# Altium PCB PCB_LV.PcbDoc
Units mm, origin at the board's own origin, x right, y up, seen from the top; angles counter-clockwise.
Board outline 41.98 x 19.29 mm, 4 copper layers (Top Layer, Layer 1, Layer 2, Bottom Layer), stack 0.603 mm thick; 21 components, 18 nets, 94 pads, 13 vias.
Unrouted connection lines stored in the file: 6.
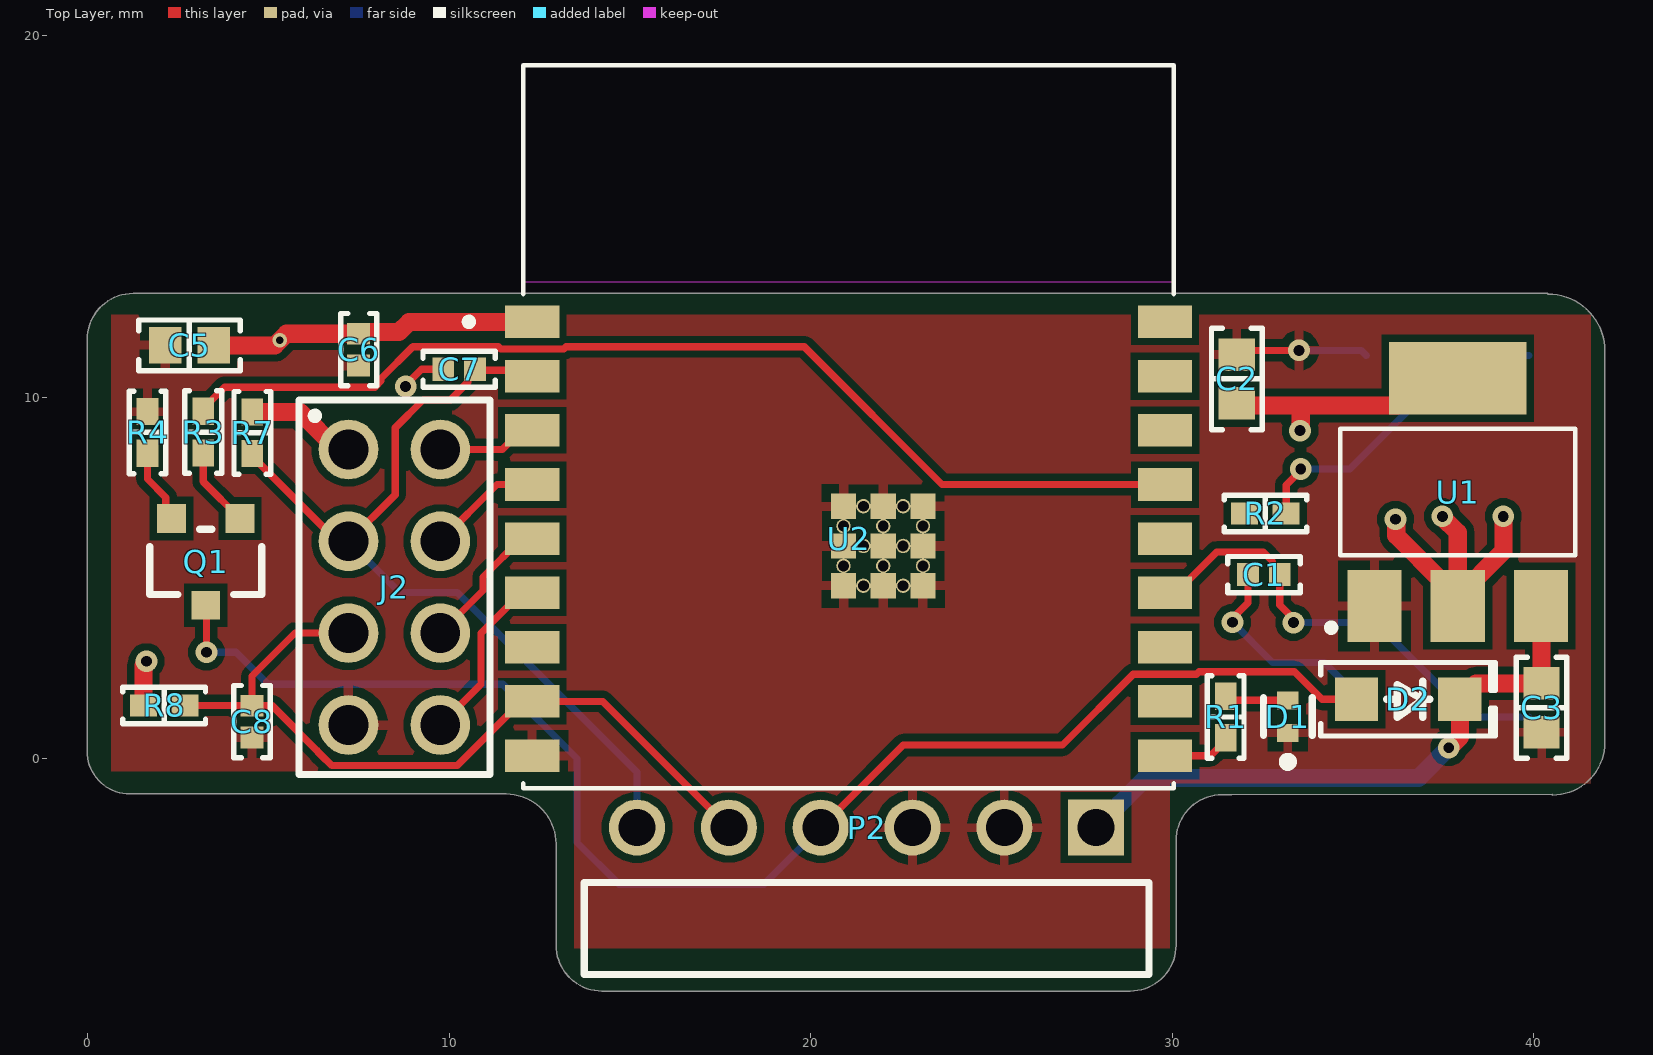
[diagram p0: Top Layer view]
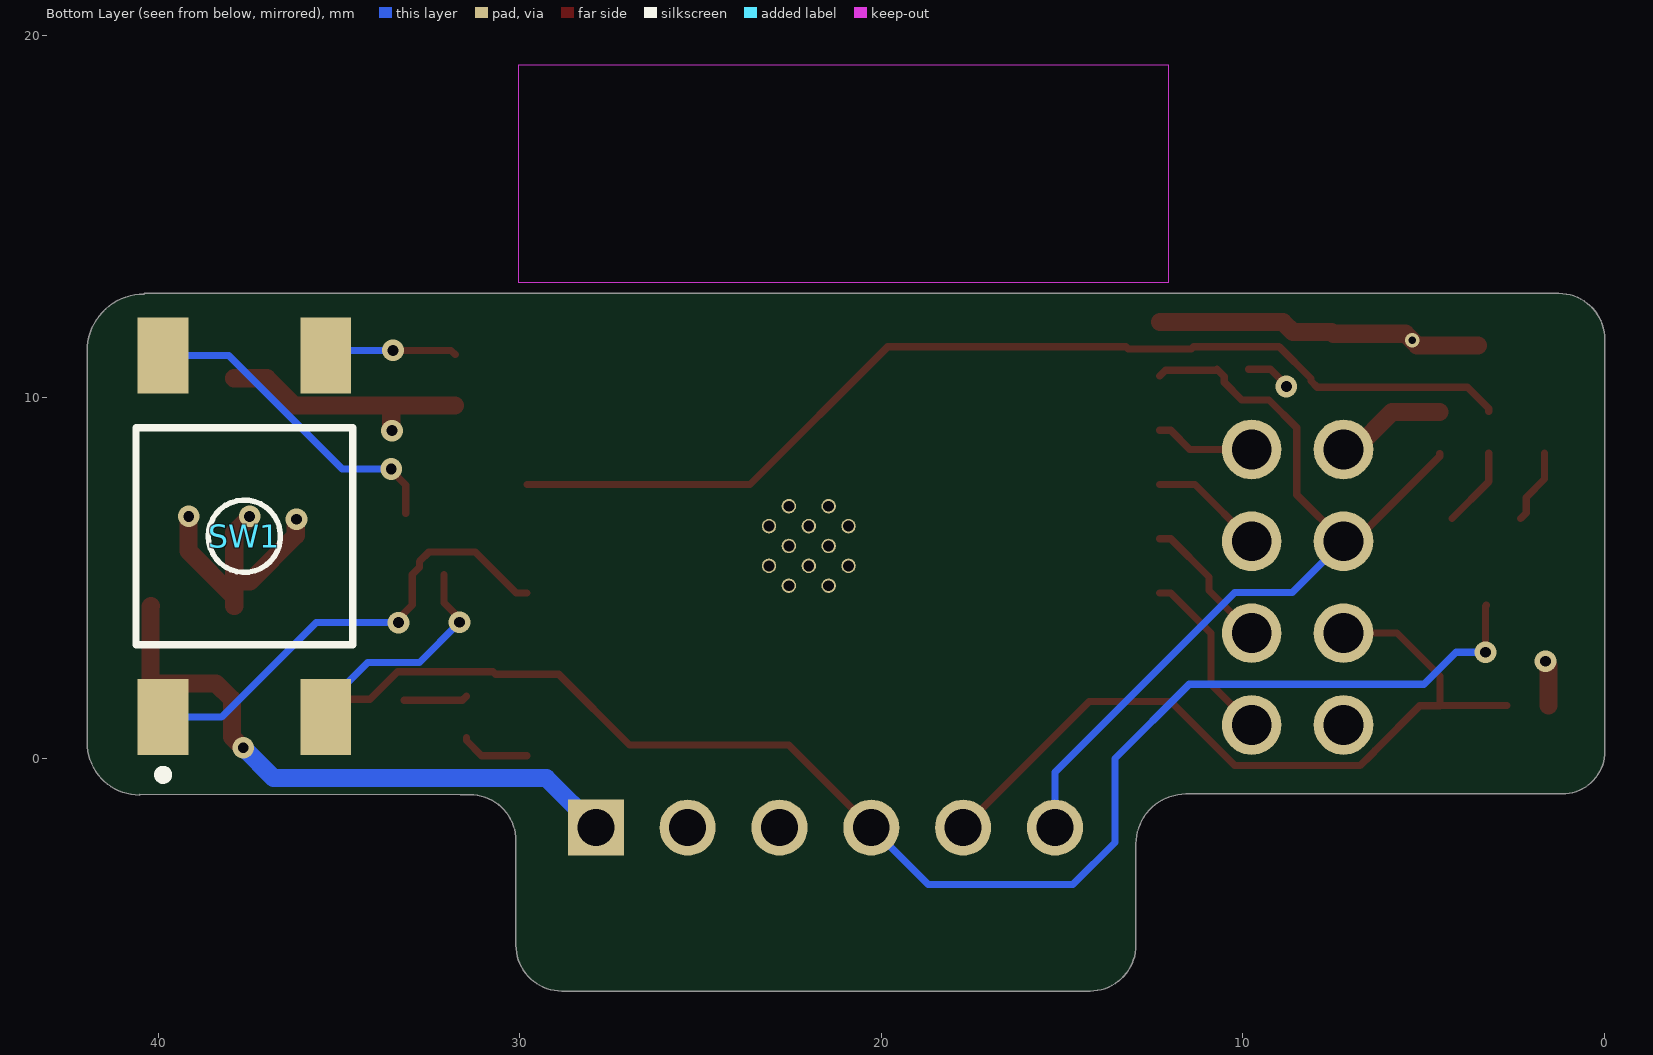
[diagram p1: Bottom Layer view, seen from below]
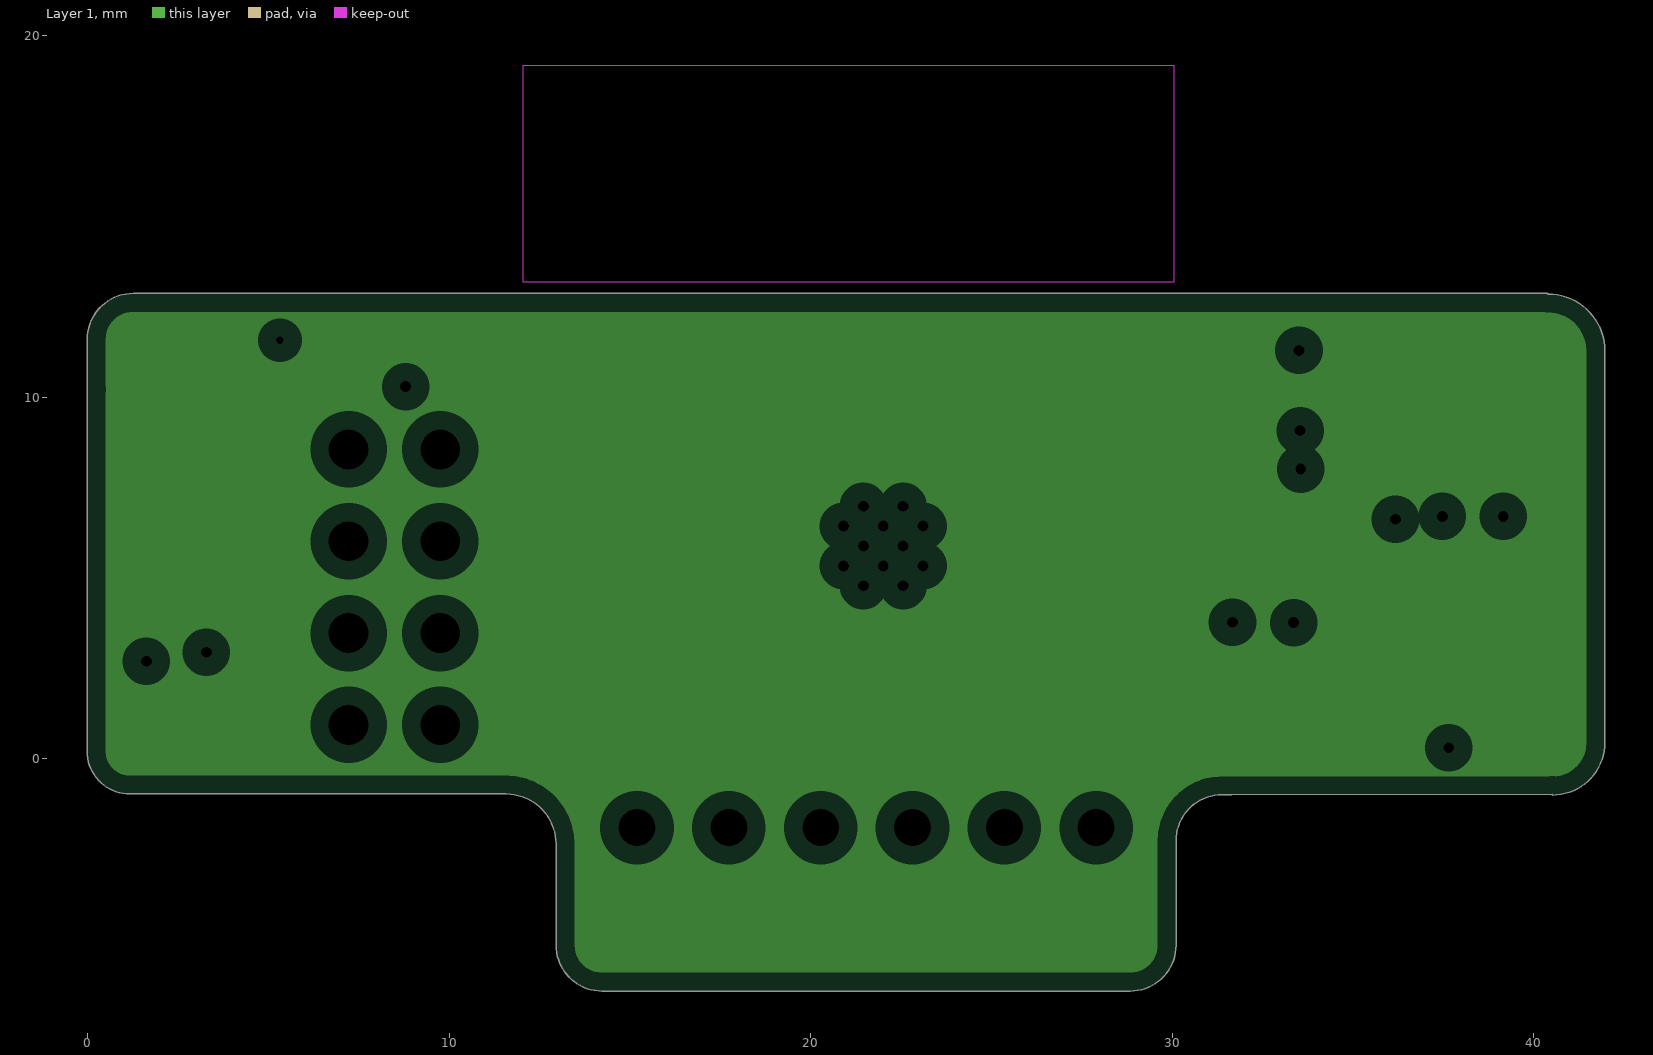
[diagram p2: Layer 1, clearances drawn from the general rule]
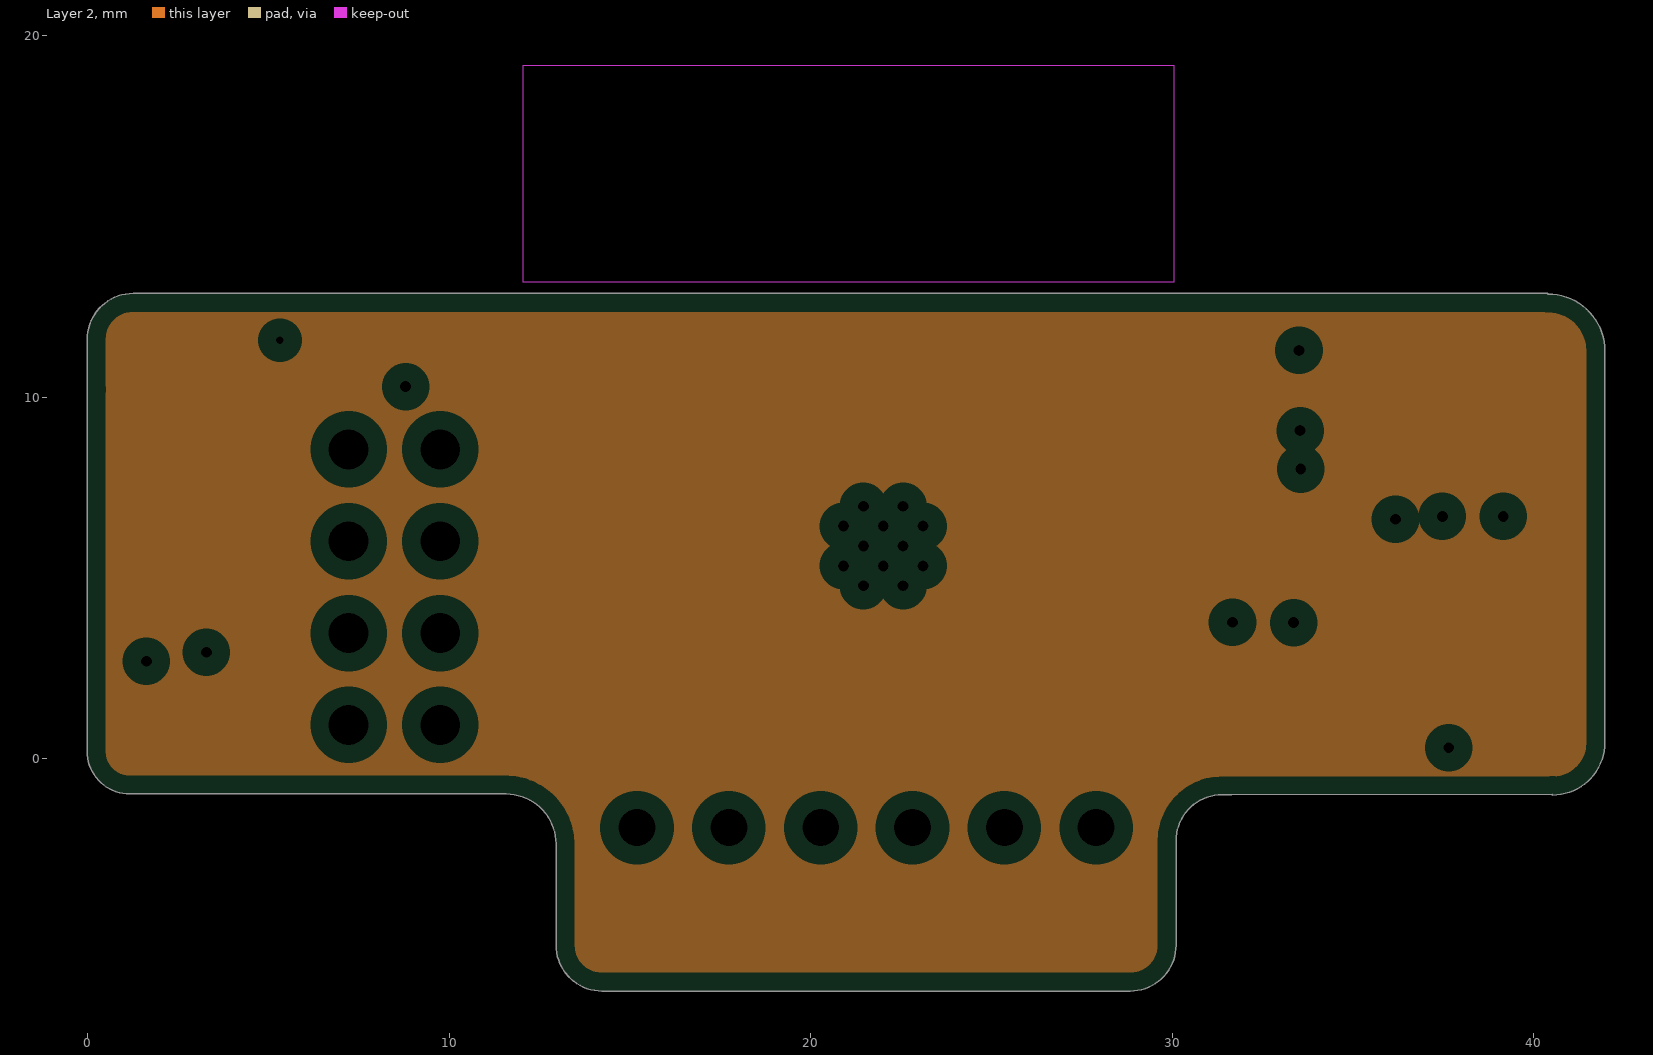
[diagram p3: Layer 2, clearances drawn from the general rule]

## Layer stack, top to bottom
Top Solder: solder mask 0.0102, Solder Resist, Dk 3.5
Top Layer: signal copper 0.0356
Dielectric 2: prepreg 0.0711, PP-006, Dk 4.1
Layer 1: plane copper 0.035, net GND
Dielectric 1: dielectric 0.32, FR-4, Dk 4.8
Layer 2: plane copper 0.035, net 3V3
Dielectric 3: prepreg 0.0711, PP-006, Dk 4.1
Bottom Layer: signal copper 0.0356
Bottom Solder: solder mask 0.0102, Solder Resist, Dk 3.5

## Board outline
1.172,-0.97 cw(c1.172,0.212) -0.01,0.212 -0.01,10.21 ccw(c-0.01,10.22) 0,10.22 -0.01,10.22 -0.01,11.604 cw(c1.26,11.604) 1.26,12.874 40.392,12.874 40.392,12.859 cw(c40.392,11.281) 41.97,11.281 41.97,0.451 cw(c40.519,0.451) 40.519,-1 40.519,-0.975 31.649,-0.989 31.38,-0.989 ccw(c31.38,-2.259) 30.11,-2.259 30.11,-5.15 cw(c28.84,-5.15) 28.84,-6.42 14.23,-6.42 cw(c14.23,-5.15) 12.96,-5.15 12.96,-2.352 ccw(c11.578,-2.352) 11.578,-0.97

## Design rules (kind name [scope] priority, off if disabled: settings)
Clearance HV_LV_Clearance [InNetClass('High Power') vs InNetClass('Low Power')] p1: gap=0.254 ignorepadtopadclearanceinfootprint=FALSE
Clearance [All] p2: gap=0.2 ignorepadtopadclearanceinfootprint=FALSE
MinimumSolderMaskSliver [All] p1: minsoldermaskwidth=0.1
PlaneClearance [All] p1: clearance=0.508
PlaneConnect [All] p1: planeconnectstyle=Direct reliefexpansion=0.508 reliefentries=4 reliefconductorwidth=0.254 reliefairgap=0.254
PolygonConnect [All] p1: connectstyle=Relief reliefconductorwidth=0.254 reliefentries=4 polygonreliefangle="90 Angle" airgapwidth=0.254
RoutingVias Via_LV [All] p1: holewidth=0.3 width=0.6 viastyle="Through Hole" minholewidth=0.2 minwidth=0.4 maxholewidth=0.3 maxwidth=0.6
SilkToSolderMaskClearance [IsText] p1: minsilkscreentomaskgap=0.004 clearancetoexposedcopper=TRUE
SolderMaskExpansion [All] p1: expansion=0 istentingtop=FALSE
SupplyNets "Schematic Supply Nets_2" [InNet('3V3')] p1: voltage=0.000
SupplyNets "Schematic Supply Nets_1" [InNet('GND')] p2: voltage=0.000
SupplyNets "Schematic Supply Nets" [InNet('5V')] p3: voltage=0.000
Width Width_LV [InNetClass('LV')] p1: maxlimit=0.5 minlimit=0.5 preferedwidth=0.5
Width [All] p2: maxlimit=0.2 minlimit=0.1 preferedwidth=0.15
26 further rules are at their usual default settings.

## Classes and differential pairs
net class LV: 3V3 5V

## Components (designator, comment, footprint, x,y, rotation, side; value= is the part's Value field where it differs from the comment)
C1 "=VALUE" "CAP 0402_1005" 32.54,5.1 r0 top
C2 "10 µF" "CAP 0603_1608" 31.79,10.51 r270 top
C3 "10 µF" "CAP 0603_1608" 40.22,1.415 r90 top
C5 "=VALUE" "CAP 0603_1608" 2.82,11.44 r180 top
C6 "=VALUE" "CAP 0402_1005" 7.5,11.32 r90 top
C7 "=VALUE" "CAP 0402_1005" 10.28,10.78 r0 top
C8 "=VALUE" "CAP 0402_1005" 4.55,1.03 r90 top
D1 "SML-P11DTT86R" FP-SML-P11-MFG 33.2,1.17 r90 top
D2 "1N4007FLTR" SOD123F 36.53,1.65 r0 top
J2 "6130XX21121_61300821121" 61300821121 8.49,4.75 r270 top
P2 "TSW-106-08-F-S-RA" SMTC-TSW-106-08-X-S-RA 27.9,-1.9 r180 top
Q1 "AO3400A" FP-SOT23-MFG 3.27,5.45 r270 top
R1 "1 kOhms" "RES 0402_1005" 31.48,1.16 r270 top
R2 "10 kOhms" "RES 0402_1005" 32.58,6.79 r180 top
R3 "100 Ohms" "RES 0402_1005" 3.2,9.04 r270 top
R4 "100 kOhms" "RES 0402_1005" 1.66,9.03 r270 top
R7 "10 kOhms" "RES 0402_1005" 4.56,9.02 r90 top
R8 "10 kOhms" "RES 0402_1005" 2.12,1.48 r180 top
SW1 "1301.9320" FP-1301_9320-MFG 37.62,6.16 r90 bottom
U1 "NCP1117LPST33T3G" SOT230P700X175-4N 37.9,7.38 r90 top
U2 "ESP32-C3-WROOM-02-N4" *MODULE_ESP32-C3-WROOM-02-H4 21.05,9.19 r0 top

## Footprints (in the part's own frame and the unit in brackets; to place one, negate y for a bottom-side part, rotate by r counter-clockwise, add the part's x,y. Pads: shape width x height; smd on the part's side, far side on the other; paste and mask are expansions set on the pad)
61300821121 [mm]
  round 1.65 hole 1.1: 1(-3.81,-1.27) 2(-3.81,1.27) 3(-1.27,-1.27) 4(-1.27,1.27) 5(1.27,-1.27) 6(1.27,1.27) 7(3.81,-1.27) 8(3.81,1.27)
  silkscreen extent -5.18,-2.64 5.18,2.64, body extent -4.95,-2.54 5.21,2.54, height 8.54
*MODULE_ESP32-C3-WROOM-02-H4 [mm]
  rect 1.5x0.9 smd: 1(-8.75,2.9) 2(-8.75,1.4) 3(-8.75,-0.1) 4(-8.75,-1.6) 5(-8.75,-3.1) 6(-8.75,-4.6) 7(-8.75,-6.1) 8(-8.75,-7.6) 9(-8.75,-9.1) 10(8.75,-9.1) 11(8.75,-7.6) 12(8.75,-6.1) 13(8.75,-4.6) 14(8.75,-3.1) 15(8.75,-1.6) 16(8.75,-0.1) 17(8.75,1.4) 18(8.75,2.9)
  rect 0.7x0.7 smd: 19(-0.14,-2.2) 20(0.96,-2.2) 21(2.06,-2.2) 22(-0.14,-3.3) 23(0.96,-3.3) 24(2.06,-3.3) 25(-0.14,-4.4) 26(0.96,-4.4) 27(2.06,-4.4)
  round 0.4 hole 0.3: 28(0.41,-2.2) 29(1.51,-2.2) 30(-0.14,-2.75) 31(0.96,-2.75) 32(2.06,-2.75) 33(0.41,-3.3) 34(1.51,-3.3) 35(-0.14,-3.85) 36(0.96,-3.85) 37(2.06,-3.85) 38(0.41,-4.4) 39(1.51,-4.4)
  Keep-Out Layer region: -9,10 9,10 9,4 -9,4
  Keep-Out Layer region: -9,10 9,10 9,4 -9,4
  Keep-Out Layer region: -9,10 9,10 9,4 -9,4
  Keep-Out Layer region: -9,10 9,10 9,4 -9,4
  Keep-Out Layer region: -9,10 9,10 9,4 -9,4
  Keep-Out Layer region: -9,10 9,10 9,4 -9,4
  Keep-Out Layer region: -9,10 9,10 9,4 -9,4
  Keep-Out Layer region: -9,10 9,10 9,4 -9,4
  Keep-Out Layer region: -9,10 9,10 9,4 -9,4
  silkscreen extent -10.6,-10 9,10, body extent -9.13,-10 8.87,10, height 3.35
"CAP 0402_1005" [mm] "Chip Capacitor, 2-Leads, Body 1.02x0.51mm, IPC Medium Density"
  rect 0.6x0.64 smd: 1(-0.44,0) 2(0.44,0)
  silkscreen extent -1,-0.5 1,0.5, body extent -0.5,-0.26 0.5,0.26, height 0.52
"CAP 0603_1608" [mm] "Chip Capacitor, 2-Leads, Body 1.60x0.80mm, IPC Medium Density"
  rect 0.9x1 smd: 1(-0.675,0) 2(0.675,0)
  silkscreen extent -1.4,-0.7 1.4,0.7, body extent -0.8,-0.41 0.8,0.41, height 0.82
FP-1301_9320-MFG [mm]
  rect 2.1x1.4 smd paste+0 mask+0: 1(-5,2.25) 2(5,2.25) 3(-5,-2.25) 4(5,-2.25)
  silkscreen extent -6.72,-3 3,3, body extent -5,-3 5,3, height 12.5
FP-SML-P11-MFG [mm]
  rect 0.5x0.6 smd paste+0 mask+0: 1(-0.45,0) 2(0.45,0)
  silkscreen extent -1.37,-0.67 0.53,0.67, body extent -0.8,-0.43 0.8,0.43, height 0.25
FP-SOT23-MFG [mm]
  rect 0.8x0.8 smd paste+0 mask+0: 1(-1.2,0.95) 2(-1.2,-0.95) 3(1.2,0)
  silkscreen extent -0.9,-1.55 0.9,1.55, body extent -1.7,-1.78 1.7,1.78, height 0.25
"RES 0402_1005" [mm] "Chip Resistor, 2-Leads, Body 1.0x0.5mm, IPC Medium Density"
  rect 0.75x0.6 smd: 1(-0.575,0) 2(0.575,0)
  silkscreen extent -1.14,-0.51 1.14,0.51, body extent -0.5,-0.25 0.5,0.25, height 0.35
SMTC-TSW-106-08-X-S-RA [mm] ".025 SQ Post Terminal Strip Assembly, 1x6 Pins, Right Angle, 2.54mm Pitch, Male"
  rect 1.55x1.55 hole 1.02: 1(0,0)
  round 1.55 hole 1.02: 2(2.54,0) 3(5.08,0) 4(7.62,0) 5(10.16,0) 6(12.7,0)
  silkscreen extent -1.46,1.52 14.16,4.06, body extent -1.27,-0.32 13.97,9.9, height 3.05
SOD123F [mm] "SODFL, 2-Leads, Body 1.60x3.50mm, IPC Medium Density"
  rect 1.2x1.2 smd: 1(-1.43,0) 2(1.43,0)
  silkscreen extent -2.41,-1.02 2.41,1.02, body extent -1.75,-0.8 1.75,0.8, height 1.1
SOT230P700X175-4N [mm]
  rect 2x1.5 smd paste+0 mask+0.102: 1(-3.15,2.3) 2(-3.15,0) 3(-3.15,-2.3)
  rect 2x3.8 smd paste+0 mask+0.102: 4(3.15,0)
  silkscreen extent -3.85,-3.25 1.75,3.6, body extent -3.5,-3.45 3.5,3.05, height 1.57

## Part data
C1 C6 C7 C8: library part CC0402MRX5R5BB104, "CAP CER 0.1UF 6.3V X5R 0402", Capacitance="0.1 µF", Part Number=CC0402MRX5R5BB104
C2 C3: library part GMC10X7R106M6R3NT, "CAP0603 X7R 10UF 20% 6.3V", Device Package="0603 (1608 Metric)", Manufacturer="Cal-Chip Electronics, Inc.", Operating Temperature="-55°C ~ 125°C", Supplier Part Number 1=4713-GMC10X7R106M6R3NTCT-ND, Temperature Coefficient=X7R, Tolerance=±20%, Voltage - Rated=6.3V, Applications="General Purpose", Capacitance="10 µF", ComponentLink1Description=Datasheet, ComponentLink1URL=https://88ce57.p3cdn1.secureserver.net/wp-content/uploads/2023/01/gmc_series-2.pdf, ComponentLink2Description="DigiKey Link", ComponentLink2URL=https://www.digikey.com/en/products/detail/cal-chip-electronics-inc/GMC10X7R106M6R3NT/18151153, lastupdated="06/04/2026 7:21:43 PM", Lifecycle Status=Active, Minimum Order=1, Mounting Type="Surface Mount, MLCC", Package / Case="0603 (1608 Metric)", Packaging=TapeAndReel, Part Number=GMC10X7R106M6R3NT, Part Status=Active, partid=49831, Price=0.09, Series=GMC, Size / Dimension="0.063\" L x 0.031\" W (1.60mm x 0.80mm)", Supplier 1=DigiKey, Thickness (Max)="0.039\" (1.00mm)"
C5: library part GRT188R61A106KE13D, "CAP CER 10UF 10V X5R 0603", Capacitance="10 µF", Part Number=GRT188R61A106KE13D
D1: library part CMP-08952-000022-1, "LED ORANGE CLEAR 1006 SMD", Colour=Orange, Forward Current=1mA, Forward Voltage=1.9V, Manufacturer=Rohm, Package=SML-P11, Power Dissipation=52mW, Reverse Voltage=5V, Temperature="-40°C to +85°C", Temperature Range High=+85°C, Temperature Range Low=-40°C, Automotive=No, Category=Diode, ComponentLink2Description=Datasheet, ComponentLink2URL=https://d1d2qsbl8m0m72.cloudfront.net/en/products/databook/datasheet/opto/led/chip_mono/sml-p11-e.pdf, Device Class L1=Optoelectronics, Device Class L2=LEDs, Device Class L3=unset, Digikey Description="LED ORANGE CLEAR 1006 SMD", Height=0.25mm, Lead Free=Yes, Led Orientation="Top View", Luminous Intensity=7.3mcd, Manufacturer Part Number=SML-P11DTT86R, Mouser Description="LED Uni-Color Orange 2-Pin Chip 0402(1006Metric) T/R", Octopart=https://octopart.com/sml-p11dtt86r-rohm-34112313, RoHS=TRUE, Wavelength=605nm
D2: "STANDARD RECTIFIER 1000V SOD-123", Part Number=1N4007FLTR
J2: "Connector Header Through Hole 8 position 0.100 (2.54mm)", Package=None, Check_prices=https://www.snapeda.com/parts/61300821121/Wurth+Electronics/view-part/?ref=eda, MF="Wurth Electronics", MP=61300821121, SnapEDA_Link=https://www.snapeda.com/parts/61300821121/Wurth+Electronics/view-part/?ref=snap
P2: library part CMP-1024-00389-1, "0.025\" SQ Post Header, Through-hole, Right Angle, -55 to 125 degC, 2.54 mm Pitch, 6-Pin, Male, RoHS", Manufacturer=Samtec, Temperature Range="-55 to 125 degC", ComponentLink1Description="Manufacturer URL", ComponentLink1URL=http://www.samtec.com, ComponentLink2Description=Datasheet, ComponentLink2URL=http://www.samtec.com/documents/webfiles/pdf/TSW_TH.PDF, ComponentLink3Description="Package Specification", ComponentLink3URL=http://www.samtec.com/documents/webfiles/cpdf/TSW-XXX-XX-XXX-X-XX-XXX-MKT.pdf, DatasheetVersion=F-214, Mounting Technology=Through-hole, Orientation="Right Angle", PackageDescription=".025[0.64] SQ. Post Terminal Strip Assembly", PackageReference=TSW-106-08-X-S-RA, PackageVersion="DM, 8/1988", PartNumber=TSW-106-08-F-S-RA, Pitch="2.54 mm", RoHS=True, System=Connector
Q1: library part CMP-83955-000006-1, "MOSFET N-CH 30V 5.7A SOT23", Case/Package=SOT-23, Continuous Drain Current (ID)=5.7A, Drain to Source Voltage (Vdss)=30V, Gate to Source Voltage (Vgs)=12V, Input Capacitance=630pF, Max Operating Temperature=150°C, Max Power Dissipation=1.4W, Min Operating Temperature=-55°C, Lead Free="Lead Free", Mount="Surface Mount", Number of Elements=1, Number of Pins=3, Packaging="Tape and Reel", Power Dissipation=1.4W, Radiation Hardening=No, Rds On Max=26.5mR
R1: library part TNPU04021K00BZEP00, "TNPU0402 1K0 0.1% T-16 EP1 E3", Device Package="0402 (1005 Metric)", Manufacturer="Vishay Dale", Operating Temperature="-55°C ~ 125°C", Power (Watts)="0.063W, 1/16W", Ratings=AEC-Q200, Supplier Device Package=0402, Supplier Part Number 1=541-TNPU04021K00BZEP00CT-ND, Temperature Coefficient=±5ppm/°C, Tolerance=±0.1%, ComponentLink1Description=Datasheet, ComponentLink1URL=http://www.vishay.com/docs/28779/tnpue3.pdf, ComponentLink2Description="DigiKey Link", ComponentLink2URL=https://www.digikey.com/en/products/detail/vishay-dale/TNPU04021K00BZEP00/10668523, Composition="Thin Film", Features="Anti-Sulfur, Automotive AEC-Q200, Moisture Resistant", Height - Seated (Max)="0.016\" (0.40mm)", lastupdated="09/02/2024 8:29:39 PM", Lifecycle Status=Active, Minimum Order=1, Number of Terminations=2, Package / Case="0402 (1005 Metric)", Packaging=TapeAndReel, Part Number=TNPU04021K00BZEP00, Part Status=Active, partid=49940, Price=0.67, Resistance="1 kOhms", Series="TNPU e3", Size / Dimension="0.039\" L x 0.020\" W (1.00mm x 0.50mm)", Supplier 1=DigiKey
R2 R7 R8: library part TNPU040210K0BZEP00, "TNPU0402 10K 0.1% T-16 EP1 E3", Part Number=TNPU040210K0BZEP00
R3: library part TNPU0402100RBZEP00, "TNPU0402 100R 0.1% T-16 EP1 E3", Part Number=TNPU0402100RBZEP00
R4: library part TNPU0402100KBZEP00, "TNPU0402 100K 0.1% T-16 EP1 E3", Part Number=TNPU0402100KBZEP00
SW1: library part CMP-26321-000001-1, "SWITCH TACTILE SPST-NO 0.05A 12V", Contact Current Rating=50mA, Contact Resistance=100mΩ, Manufacturer=Schurter, Operating Force=1.6N, Package=0, Temperature="-20°C to +70°C", Temperature Range High=+70°C, Temperature Range Low=-20°C, Voltage Rating Dc=12V, Automotive=No, Category=Switch, ComponentLink2Description=Datasheet, ComponentLink2URL=https://www.schurter.com/en/datasheet/typ_6x6_mm_tact_switches.pdf, Device Class L1=Electromechanical, Device Class L2=Switches, Device Class L3="Tactile Switches", Digikey Description="SWITCH TACTILE SPST-NO 0.05A 12V", Electromechanical Life=100000Cycles, Height=12.5mm, Lead Free=Yes, Manufacturer Part Number=1301.9320, Mount="Surface Mount", Octopart=https://octopart.com/1301.9320-schurter-6627962, RoHS=TRUE, Throw Configuration=SPST-NO
U1: "Linear Voltage Regulator IC Positive Fixed 1 Output 1A SOT-223", Package="SOT-223-4 ON Semiconductor", Check_prices=https://www.snapeda.com/parts/NCP1117LPST33T3G/Onsemi/view-part/?ref=eda, MF="ON Semiconductor", MP=NCP1117LPST33T3G, SnapEDA_Link=https://www.snapeda.com/parts/NCP1117LPST33T3G/Onsemi/view-part/?ref=snap
U2: "WiFi Modules (802.11) (Engineering Samples) SMD module, ESP32-C3, 4MB SPI flash, PCB antenna, -40 C +85 C", Package=Package, Availability="In Stock", Check_prices=https://www.snapeda.com/parts/ESP32-C3-WROOM-02-N4/Espressif+Systems/view-part/?ref=eda, MF="Espressif Systems", MP=ESP32-C3-WROOM-02-N4, Price=None, Purchase-URL="https://www.snapeda.com/api/url_track_click_mouser/?unipart_id=5683419&manufacturer=Espressif Systems&part_name=ESP32-C3-WROOM-02-N4&search_term=esp32-c3-wroom-02", SnapEDA_Link=https://www.snapeda.com/parts/ESP32-C3-WROOM-02-N4/Espressif+Systems/view-part/?ref=snap

## Via types
v1: diameter 0.6, hole 0.3, Top Layer to Bottom Layer, 12 vias
v2: diameter 0.4, hole 0.2, Top Layer to Bottom Layer, 1 vias

## Nets (pads, with @x,y where several pads share a name; then routed paths per layer and width w, separated by ;. In a path a pad name is that pad's centre, name@x,y a point inside that pad or via, vN(x,y) a via of type N, cw(c..) or ccw(c..) an arc to the next point about the centre after c; other vN are vias at no path point)
3V3: C2.2 C5.1 C6.2 J2.1 R2.2 R7.2 R8.2 U1.2 U1.4 U2.1 | length 28.9
  Top Layer w0.5: R8.2 1.545,2.588 1.63,2.673 v1(1.63,2.7) ; C5.1 5.18,11.44 5.5,11.76 C6.2 7.55,11.81 8.62,11.81 8.9,12.09 U2.1 ; R7.2 5.874,9.595 6.909,8.56 J2.1 ; C2.2@31.79,9.775 33.63,9.775 ; v1(33.54,9.08) 33.559,9.099 33.559,9.704 33.63,9.775 ; v1(36.18,6.63) 36.199,6.611 36.199,6.181 37.47,4.91 U1.2@37.9,4.91 ; v1(37.476,6.709) 37.476,6.681 37.9,6.258 U1.2@37.9,4.91 ; U1.4 37,10.53 36.245,9.775 33.63,9.775 ; v1(39.16,6.71) 39.17,6.7 39.17,5.75 37.9,4.48 U1.2 U1.2@37.9,4.91
  other v2: 5.32,11.58
5V: C3.2 D2.2 P2.1 U1.3 | length 16.7
  Top Layer w0.5: v1(37.65,0.31) 37.667,0.31 37.96,0.603 D2.2 38.4,2.09 C3.2 40.22,4.21 U1.3
  Bottom Layer w0.5: P2.1 29.27,-0.53 36.81,-0.53 v1(37.65,0.31)
BOOT: C8.2 J2.5 P2.5 R8.1 U2.8 | length 21.9
  Top Layer w0.2: R8.1 4.54,1.48 C8.2 ; J2.5 5.737,3.48 4.55,2.293 C8.2 ; 10.938,0.527 10.226,-0.185 6.848,-0.185 6.765,-0.185 6.438,0.131 cw(c7.22,0.94) 6.337,0.243 5.11,1.47 C8.2 ; 10.938,0.528 12,1.59 U2.8 14.25,1.59 P2.5
BP1: C1.2 SW1.1 U2.13 | length 13.1
  Top Layer w0.2: U2.13 30.1,4.59 31.23,5.72 32.524,5.72 32.78,5.464 32.78,5.3 C1.2 32.98,4.258 33.36,3.878 v1(33.36,3.77)
  Bottom Layer w0.2: v1(33.36,3.77) 35.64,3.77 38.25,1.16 SW1.1
CMD: R3.1 U2.15 | length 29
  Top Layer w0.2: R3.1 3.2,9.69 3.79,10.28 7.944,10.28 8.12,10.456 8.12,10.52 9,11.4 11.366,11.4 11.426,11.34 13.174,11.34 13.234,11.4 19.824,11.4 23.634,7.59 U2.15
EN: C7.2 J2.3 P2.6 R7.1 U2.2 | length 24.2
  Top Layer w0.2: R7.1 4.56,8.37 6.91,6.02 J2.3 8.51,7.31 8.51,9.161 9.279,9.93 10.034,9.93 10.52,10.416 10.52,10.58 C7.2 10.75,10.75 12.14,10.75 U2.2
  Bottom Layer w0.2: J2.3 8.635,4.605 10.226,4.605 15.2,-0.369 P2.6
GND: C2.1 C3.1 C5.2 C6.1 C7.1 C8.1 D1.1 J2.7 P2.2 P2.3 R4.1 SW1.4 U1.1 U2.9 U2.19 U2.20 U2.21 U2.22 U2.23 U2.24 U2.25 U2.26 U2.27 U2.28 U2.29 U2.30 U2.31 U2.32 U2.33 U2.34 U2.35 U2.36 U2.37 U2.38 U2.39 | length 4.9
  Top Layer w0.2: v1(8.8,10.3) 8.8,10.34 9.24,10.78 C7.1 ; C2.1 31.905,11.3 v1(33.51,11.3)
  Bottom Layer w0.2: v1(33.51,11.3) 35.23,11.3 SW1.4
LED: R1.2 U2.10 | length 1.9
  Top Layer w0.2: U2.10 31.06,0.09 31.48,0.51 R1.2
NetC1_1: C1.1 SW1.3 | length 6.5
  Top Layer w0.2: v1(31.67,3.78) 31.67,3.888 32.1,4.318 C1.1
  Bottom Layer w0.2: v1(31.67,3.78) 32.78,2.67 34.21,2.67 35.37,1.51 SW1.3
NetD1_2: D1.2 R1.1 | length 1.8
  Top Layer w0.2: R1.1 31.595,1.62 D1.2
NetQ1_1: Q1.1 R3.2 | length 2.2
  Top Layer w0.2: R3.2 3.2,7.67 Q1.1
NetQ1_2: Q1.2 R4.2 | length 2.1
  Top Layer w0.2: R4.2 1.66,7.74 2.167,7.233 2.167,6.803 Q1.2
NetR2_1: R2.1 SW1.2 | length 9
  Top Layer w0.2: R2.1 33.155,7.576 33.56,7.981 v1(33.56,8.02)
  Bottom Layer w0.2: v1(33.56,8.02) 34.914,8.02 38.054,11.16 SW1.2
Relais: D2.1 P2.4 Q1.3 | length 39.9
  Top Layer w0.2: Q1.3 3.29,4.23 v1(3.29,2.95) ; P2.4 22.564,0.384 26.97,0.384 28.926,2.34 30.674,2.34 30.744,2.41 33.384,2.41 34.144,1.65 D2.1
  Bottom Layer w0.2: v1(3.29,2.95) 4.11,2.95 4.995,2.065 11.485,2.065 13.54,0.01 13.54,-2.31 14.7,-3.47 18.71,-3.47 P2.4
TCK: J2.6 U2.5 | length 3.8
  Top Layer w0.2: J2.6 10.942,4.662 10.942,5.032 12,6.09 U2.5
TDI: J2.4 U2.4 | length 3.2
  Top Layer w0.2: J2.4 11.33,7.59 U2.4
TDO: J2.8 U2.6 | length 4.9
  Top Layer w0.2: J2.8 10.885,2.065 10.885,3.475 12,4.59 U2.6
TMS: J2.2 U2.3 | length 2.8
  Top Layer w0.2: J2.2 11.47,8.56 12,9.09 U2.3
pads on no net: U2.7 U2.11 U2.12 U2.14 U2.16 U2.17 U2.18

## Polygon pours and split planes (outlines as drawn)
GND on Top Layer "GND_L01_P000" (solid, pour order 0): 0.66,12.28 41.58,12.28 41.58,-0.67 29.94,-0.67 29.94,-5.23 13.469,-5.23 13.469,-0.34 0.66,-0.34
no net on Layer 2 (split plane): 1.26,12.363 40.277,12.363 40.292,12.359 40.392,12.349 40.405,12.35 40.531,12.342 40.669,12.315 40.801,12.27 40.927,12.208 41.043,12.13 41.148,12.038 41.241,11.933 41.318,11.816 41.38,11.691 41.425,11.558 41.453,11.421 41.461,11.295 41.46,11.281 41.46,0.451 41.461,0.439 41.453,0.328 41.429,0.207 41.39,0.09 41.335,-0.02 41.267,-0.123 41.185,-0.215 41.093,-0.297 40.99,-0.365 40.88,-0.42 40.763,-0.459 40.646,-0.483 40.618,-0.474 40.557,-0.468 40.518,-0.465 31.648,-0.479 31.38,-0.479 31.374,-0.479 31.206,-0.488 31.033,-0.513 30.863,-0.556 30.699,-0.615 30.541,-0.689 30.391,-0.779 30.251,-0.883 30.121,-1.001 30.004,-1.13 29.9,-1.27 29.81,-1.42 29.735,-1.578 29.677,-1.743 29.634,-1.912 29.608,-2.085 29.6,-2.253 29.6,-2.259 29.6,-5.15 29.601,-5.163 29.592,-5.269 29.565,-5.385 29.519,-5.496 29.456,-5.598 29.379,-5.689 29.288,-5.766 29.186,-5.829 29.075,-5.875 28.959,-5.902 28.853,-5.911 28.84,-5.91 14.23,-5.91 14.217,-5.911 14.111,-5.902 13.995,-5.875 13.884,-5.829 13.782,-5.766 13.691,-5.689 13.614,-5.598 13.551,-5.496 13.505,-5.385 13.478,-5.269 13.469,-5.163 13.47,-5.15 13.47,-2.352 13.47,-2.349 13.461,-2.167 13.434,-1.983 13.389,-1.803 13.326,-1.628 13.247,-1.46 13.151,-1.301 13.041,-1.152 12.916,-1.014 12.778,-0.889 12.629,-0.779 12.47,-0.683 12.302,-0.604 12.127,-0.541 11.947,-0.496 11.763,-0.469 11.581,-0.46 11.578,-0.46 1.172,-0.46 1.161,-0.461 1.066,-0.453 0.964,-0.429 0.866,-0.388 0.776,-0.333 0.696,-0.264 0.627,-0.184 0.572,-0.094 0.531,0.004 0.507,0.106 0.499,0.201 0.5,0.212 0.5,10.118 0.501,10.118 0.511,10.22 0.51,10.22 0.501,10.32 0.5,10.32 0.5,11.604 0.499,11.617 0.508,11.723 0.535,11.839 0.581,11.95 0.644,12.052 0.721,12.143 0.812,12.22 0.914,12.283 1.025,12.328 1.141,12.356 1.247,12.365
no net on Layer 1 (split plane): 1.26,12.363 40.277,12.363 40.292,12.359 40.392,12.349 40.405,12.35 40.531,12.342 40.669,12.315 40.801,12.27 40.927,12.208 41.043,12.13 41.148,12.038 41.241,11.933 41.318,11.816 41.38,11.691 41.425,11.558 41.453,11.421 41.461,11.295 41.46,11.281 41.46,0.451 41.461,0.439 41.453,0.328 41.429,0.207 41.39,0.09 41.335,-0.02 41.267,-0.123 41.185,-0.215 41.093,-0.297 40.99,-0.365 40.88,-0.42 40.763,-0.459 40.646,-0.483 40.618,-0.474 40.557,-0.468 40.518,-0.465 31.648,-0.479 31.38,-0.479 31.374,-0.479 31.206,-0.488 31.033,-0.513 30.863,-0.556 30.699,-0.615 30.541,-0.689 30.391,-0.779 30.251,-0.883 30.121,-1.001 30.004,-1.13 29.9,-1.27 29.81,-1.42 29.735,-1.578 29.677,-1.743 29.634,-1.912 29.608,-2.085 29.6,-2.253 29.6,-2.259 29.6,-5.15 29.601,-5.163 29.592,-5.269 29.565,-5.385 29.519,-5.496 29.456,-5.598 29.379,-5.689 29.288,-5.766 29.186,-5.829 29.075,-5.875 28.959,-5.902 28.853,-5.911 28.84,-5.91 14.23,-5.91 14.217,-5.911 14.111,-5.902 13.995,-5.875 13.884,-5.829 13.782,-5.766 13.691,-5.689 13.614,-5.598 13.551,-5.496 13.505,-5.385 13.478,-5.269 13.469,-5.163 13.47,-5.15 13.47,-2.352 13.47,-2.349 13.461,-2.167 13.434,-1.983 13.389,-1.803 13.326,-1.628 13.247,-1.46 13.151,-1.301 13.041,-1.152 12.916,-1.014 12.778,-0.889 12.629,-0.779 12.47,-0.683 12.302,-0.604 12.127,-0.541 11.947,-0.496 11.763,-0.469 11.581,-0.46 11.578,-0.46 1.172,-0.46 1.161,-0.461 1.066,-0.453 0.964,-0.429 0.866,-0.388 0.776,-0.333 0.696,-0.264 0.627,-0.184 0.572,-0.094 0.531,0.004 0.507,0.106 0.499,0.201 0.5,0.212 0.5,10.118 0.501,10.118 0.511,10.22 0.51,10.22 0.501,10.32 0.5,10.32 0.5,11.604 0.499,11.617 0.508,11.723 0.535,11.839 0.581,11.95 0.644,12.052 0.721,12.143 0.812,12.22 0.914,12.283 1.025,12.328 1.141,12.356 1.247,12.365

## Silkscreen, mask and mechanical layers (free items; w line width, h text height)
Mechanical 1:
  lines w0.254: -0.01,10.22 -0.01,11.604 cw(c1.26,11.604) 1.26,12.874 1.994,12.874 40.392,12.874 ; 0,10.22 cw(c-0.01,10.22) -0.01,10.21 -0.01,0.212 ccw(c1.172,0.212) 1.172,-0.97 11.578,-0.97 cw(c11.578,-2.352) 12.96,-2.352 12.96,-5.15 ccw(c14.23,-5.15) 14.23,-6.42 28.84,-6.42 ccw(c28.84,-5.15) 30.11,-5.15 30.11,-2.259 cw(c31.38,-2.259) 31.38,-0.989 31.649,-0.989 40.519,-0.975 ; 40.392,12.859 cw(c40.392,11.281) 41.97,11.281 41.97,0.451 cw(c40.519,0.451) 40.519,-1